# Altium PCB Self_Balancing.PcbDoc
Units mm, origin at the board's own origin, x right, y up, seen from the top; angles counter-clockwise.
Board outline 70 x 100 mm, 2 copper layers (Top Layer, Bottom Layer); 26 components, 27 nets, 155 pads, 79 vias.
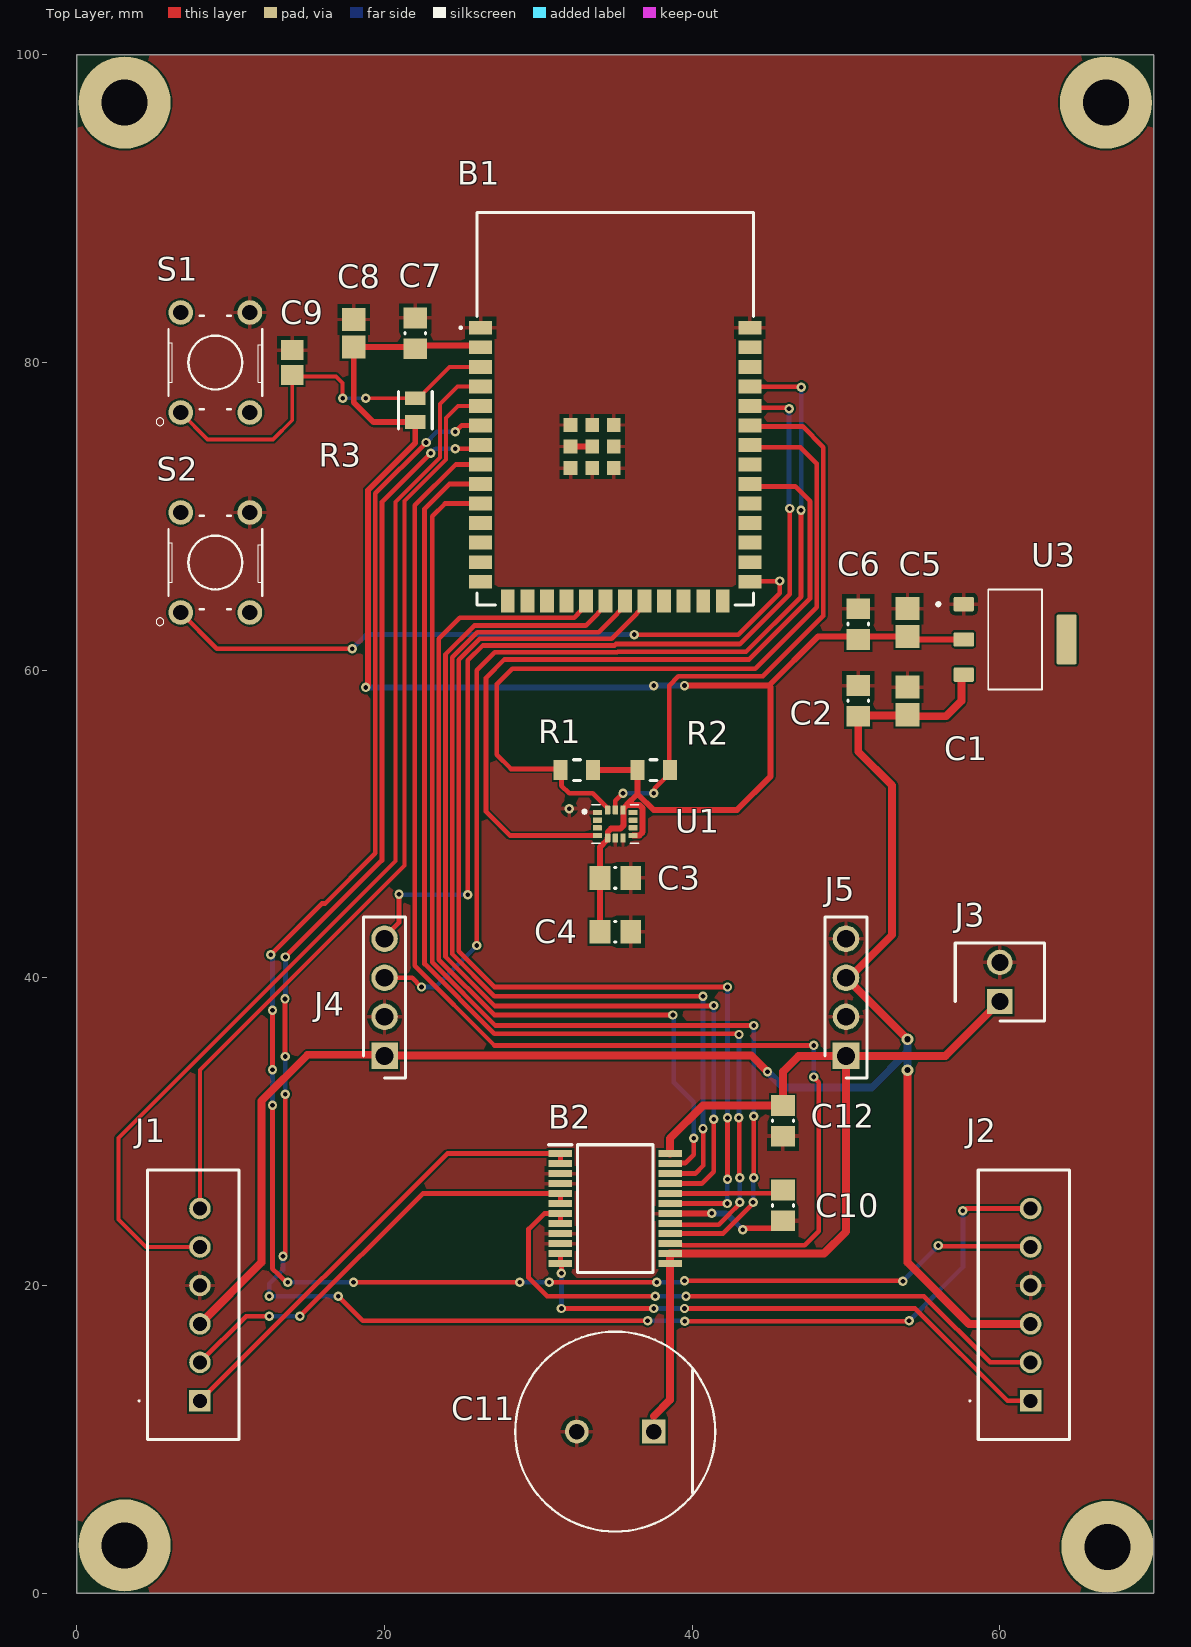
[diagram p0: Top Layer view]
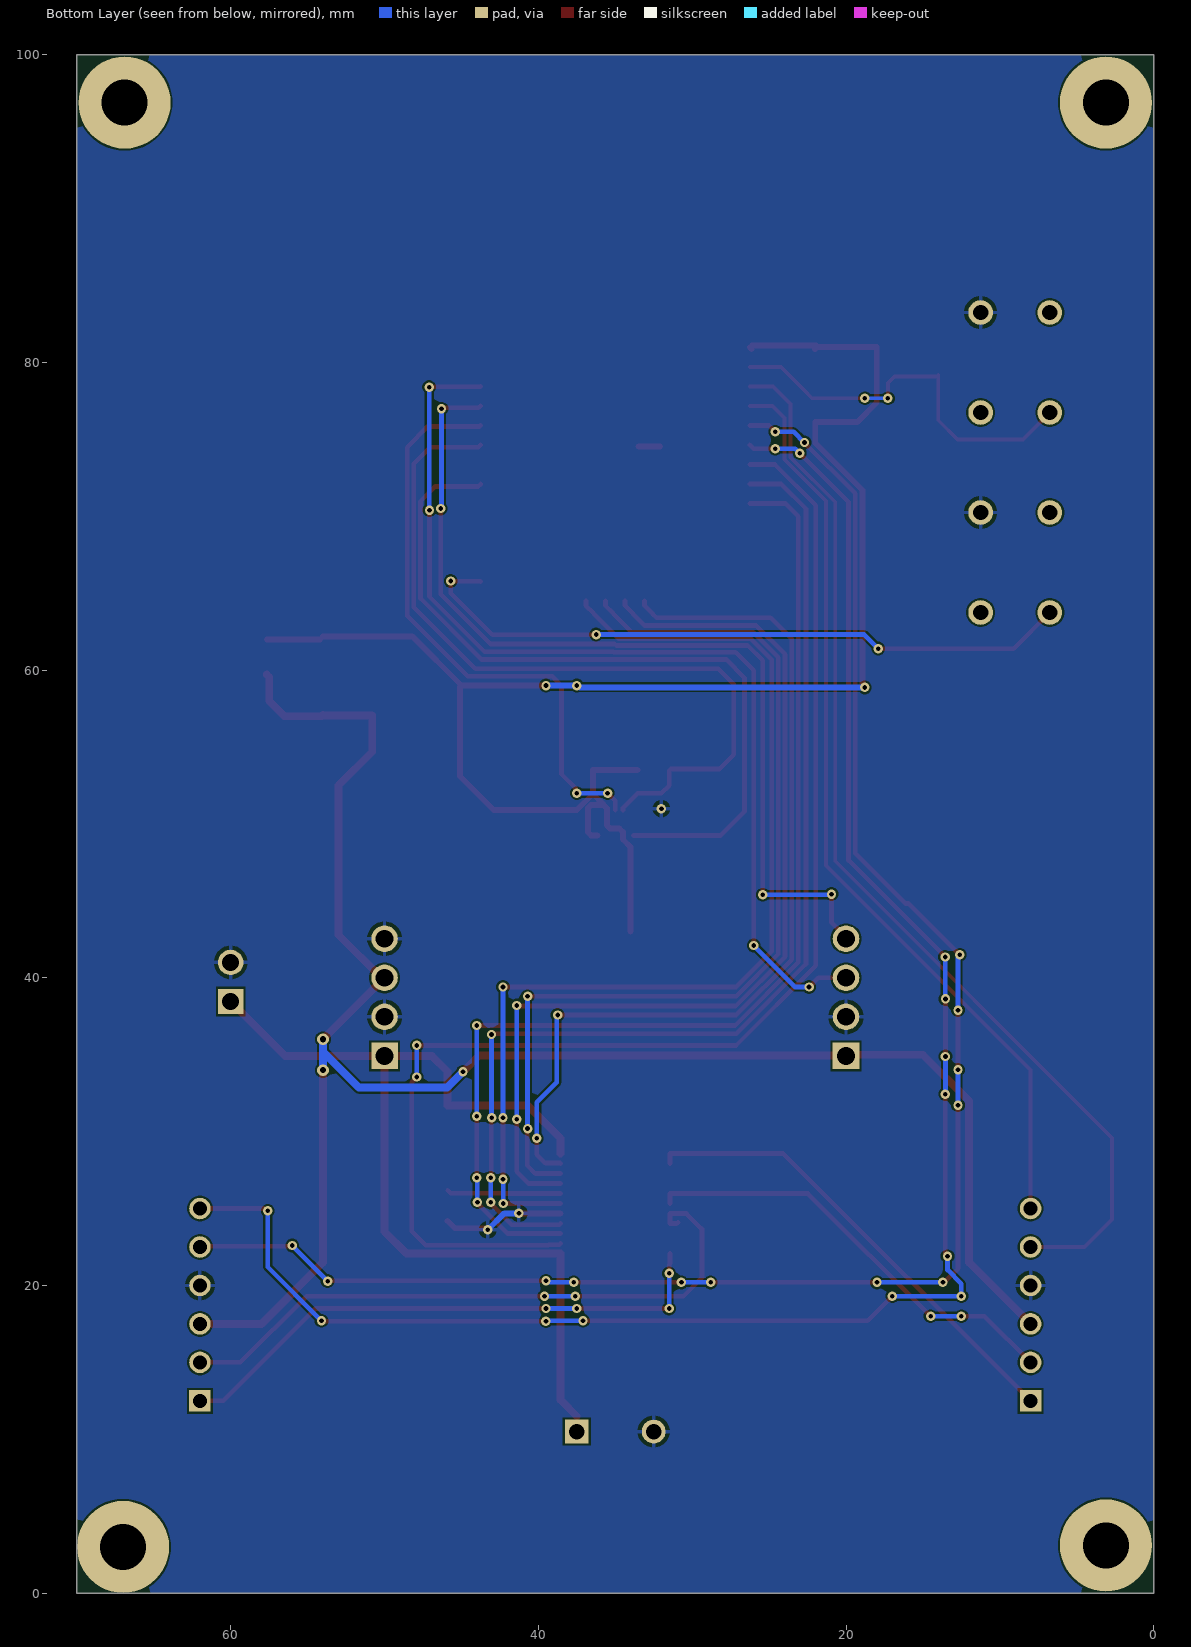
[diagram p1: Bottom Layer view, seen from below]

## Layer stack, top to bottom
Top Solder: solder mask 0.0102, Solder Resist, Dk 3.5
Top Layer: signal copper 0.0356
Dielectric 1: dielectric 0.32, FR-4, Dk 4.8
Bottom Layer: signal copper 0.0356
Bottom Solder: solder mask 0.0102, Solder Resist, Dk 3.5

## Board outline
0,0 0,100 70,100 70,0

## Design rules (kind name [scope] priority, off if disabled: settings)
Clearance [All] p1: gap=0.127 ignorepadtopadclearanceinfootprint=FALSE
HoleSize [All] p1: absolutevalues=TRUE maxlimit=5 minlimit=0.025 maxpercent=80.000 minpercent=20.000
MinimumSolderMaskSliver [All] p1: minsoldermaskwidth=0.08
PolygonConnect [All] p1: connectstyle=Relief reliefconductorwidth=0.254 reliefentries=4 polygonreliefangle="90 Angle" airgapwidth=0.254
RoutingVias [All] p1: holewidth=0.508 width=1.016 viastyle="Through Hole" minholewidth=0.305 minwidth=0.61 maxholewidth=1.27 maxwidth=2.54
SilkToSolderMaskClearance [IsPad] p1: minsilkscreentomaskgap=0.01 clearancetoexposedcopper=TRUE
SolderMaskExpansion [All] p1: expansion=0 istentingtop=FALSE
SupplyNets "Schematic Supply Nets_3" [InNet('3.3V')] p1: voltage=0.000
SupplyNets "Schematic Supply Nets_2" [InNet('12V')] p2: voltage=0.000
SupplyNets "Schematic Supply Nets_1" [InNet('5V')] p3: voltage=0.000
SupplyNets "Schematic Supply Nets" [InNet('GND')] p4: voltage=0.000
Width Width_Power [InNet('12V') OR InNet('5V') OR InNet('3.3V') OR InNet('GND')] p1: maxlimit=0.508 minlimit=0.381 preferedwidth=0.457
Width Width_Signal [All] p2: maxlimit=0.381 minlimit=0.2 preferedwidth=0.305
27 further rules are at their usual default settings.

## Components (designator, comment, footprint, x,y, rotation, side; value= is the part's Value field where it differs from the comment)
B1 "ESP32-S3-WROOM-1" ESP32S3WROOM1 35,77 r0 top locked
B2 "TB6612FNG" SOP65P760X160-24N 35,25 r0 top locked
C1 "10uF" CAPC2013X140X50ML20T25 54,58 r90 top
C2 "0.1uF" CAPC0805(2012)100_M 50.8,58 r270 top value=100nF
C3 "0.1uF" CAPC0805(2012)100_M 35,46.5 r0 top value=100nF
C4 "0.1uF" CAPC0805(2012)100_M 35,43 r0 top value=100nF
C5 "10uF" CAPC2013X140X50ML20T25 54,63.1 r90 top
C6 "0.1uF" CAPC0805(2012)100_M 50.8,63 r90 top value=100nF
C7 "0.1uF" CAPC0805(2012)100_M 22,81.9 r270 top value=100nF
C8 "10uF" CAPC2013X140X50ML20T25 18,81.9 r90 top
C9 "1uF" CAPC2013X140X50NL20T25 14,80 r270 top
C10 "0.1uF" CAPC0805(2012)100_M 45.9,25.2 r270 top value=100nF
C11 "470uF" FP-RAD-TH-D_12_5_0_5-L_30-MFG 35,10.5 r180 top
C12 "0.1uF" CAPC0805(2012)100_M 45.9,30.7 r90 top value=100nF
J1 "MOTOR_L" WAFERXH2546PZZ 8,12.5 r90 top
J2 "MOTOR_R" WAFERXH2546PZZ 62,12.5 r90 top
J3 "HDR2" SHDR2W64P0X254_1X2_508X580X1170P 60,38.46 r270 top
J4 "UART" HDRV4W95P0X254_1X4_1016X254X854P 20,34.92 r90 top
J5 "MOD_LM2596" HDRV4W95P0X254_1X4_1016X254X854P 50,34.92 r90 top
R1 "4.7kR" FP-RMCF0805-MFG 32.5,53.5 r0 top
R2 "4.7kR" FP-RMCF0805-MFG 37.5,53.5 r180 top
R3 "10kR" FP-CRGP0805-IPC_C 22,76.9 r90 top value=10KΩ
S1 "B3F-1000" SW_B3F-1000 9,80 r90 top
S2 "B3F-1000" SW_B3F-1000 9,67 r90 top
U1 "BMI160" PQFN50P250X300X88-14N 35,50 r0 top locked
U3 "AMS1117-3.3" SOT229P700X180-4N 61,62 r0 top

## Footprints (in the part's own frame and the unit in brackets; to place one, negate y for a bottom-side part, rotate by r counter-clockwise, add the part's x,y. Pads: shape width x height; smd on the part's side, far side on the other; paste and mask are expansions set on the pad)
CAPC0805(2012)100_M [mm] "Chip Capacitor, Body 2.0x1.2mm, Height 1.0mm, IPC Low Density"
  rect 1.35x1.55 smd: 1(-1,0) 2(1,0)
  silkscreen extent -0.05,-0.67 0.05,0.67, body extent -1.1,-0.72 1.1,0.72, height 1
CAPC2013X140X50ML20T25 [mm] "Chip Capacitor, 2-Leads, Body 2.00x1.25mm, IPC Low Density"
  rect 1.5x1.55 smd: 1(-0.9,0) 2(0.9,0)
  body extent -1.1,-0.72 1.1,0.72, height 1.4
CAPC2013X140X50NL20T25 [mm] "Chip Capacitor, 2-Leads, Body 2.00x1.25mm, IPC Medium Density"
  rect 1.3x1.45 smd: 1(-0.8,0) 2(0.8,0)
  body extent -1.1,-0.72 1.1,0.72, height 1.4
ESP32S3WROOM1 [mm]
  rect 1.5x0.9 smd: 1(-8.75,5.26) 2(-8.75,3.99) 3(-8.75,2.72) 4(-8.75,1.45) 5(-8.75,0.18) 6(-8.75,-1.09) 7(-8.75,-2.36) 8(-8.75,-3.63) 9(-8.75,-4.9) 10(-8.75,-6.17) 11(-8.75,-7.44) 12(-8.75,-8.71) 13(-8.75,-9.98) 14(-8.75,-11.25) 27(8.75,-11.25) 28(8.75,-9.98) 29(8.75,-8.71) 30(8.75,-7.44) 31(8.75,-6.17) 32(8.75,-4.9) 33(8.75,-3.63) 34(8.75,-2.36) 35(8.75,-1.09) 36(8.75,0.18) 37(8.75,1.45) 38(8.75,2.72) 39(8.75,3.99) 40(8.75,5.26)
  rect 0.9x1.5 smd: 15(-6.985,-12.5) 16(-5.715,-12.5) 17(-4.445,-12.5) 18(-3.175,-12.5) 19(-1.905,-12.5) 20(-0.635,-12.5) 21(0.635,-12.5) 22(1.905,-12.5) 23(3.175,-12.5) 24(4.445,-12.5) 25(5.715,-12.5) 26(6.985,-12.5)
  rect 0.9x0.9 smd: 41(-1.5,-2.46) 42(-1.5,-1.06) 43(-2.9,-1.06) 44(-2.9,-2.46) 45(-2.9,-3.86) 46(-1.5,-3.86) 47(-0.1,-3.86) 48(-0.1,-2.46) 49(-0.1,-1.06)
  silkscreen extent -10.1,-12.75 9,12.75
FP-CRGP0805-IPC_C [mm]
  rect 0.906x1.31 smd paste+0 mask+0: 1(-0.776,0) 2(0.776,0)
  silkscreen extent -1.23,-1.1 1.23,1.1, body extent -1.33,-0.8 1.33,0.8, height 0.25
FP-RAD-TH-D_12_5_0_5-L_30-MFG [mm]
  rect 1.55x1.55 hole 1 paste-2539.97 mask+0: 1(-2.5,0)
  round 1.55 hole 1 paste-2539.97 mask+0: 2(2.5,0)
  silkscreen extent -6.5,-6.5 6.5,6.5, body extent -6.6,-6.6 6.6,6.6, height 0.25
FP-RMCF0805-MFG [mm]
  rect 0.9x1.3 smd paste+0 mask+0: 1(-1.05,0) 2(1.05,0)
  silkscreen extent -0.23,-0.67 0.23,0.67, body extent -1.6,-0.77 1.6,0.77, height 0.25
HDRV4W95P0X254_1X4_1016X254X854P [mm]
  rect 1.725x1.725 / inner round 1.725 / far side rect 1.725x1.725 hole 1.15: 1(0,0)
  round 1.725 hole 1.15: 2(2.54,0) 3(5.08,0) 4(7.62,0)
  silkscreen extent -1.42,-1.37 9.04,1.37
PQFN50P250X300X88-14N [mm]
  rrect25% 0.59x0.35 smd: 1(-1.165,0.75) 2(-1.165,0.25) 3(-1.165,-0.25) 4(-1.165,-0.75) 8(1.165,-0.75) 9(1.165,-0.25) 10(1.165,0.25) 11(1.165,0.75)
  rrect25% 0.35x0.59 smd: 5(-0.5,-0.915) 6(0,-0.915) 7(0.5,-0.915) 12(0.5,0.915) 13(0,0.915) 14(-0.5,0.915)
  silkscreen extent -2.1,-1.25 1.5,1.25
SHDR2W64P0X254_1X2_508X580X1170P [mm]
  rect 1.65x1.65 / inner round 1.65 / far side rect 1.65x1.65 hole 1.1: 1(0,0)
  round 1.65 hole 1.1: 2(-2.54,0)
  silkscreen extent -3.81,-2.9 1.27,2.9
SOP65P760X160-24N [mm]
  rect 1.525x0.45 smd: 1(-3.562,3.575) 2(-3.562,2.925) 3(-3.562,2.275) 4(-3.562,1.625) 5(-3.562,0.975) 6(-3.562,0.325) 7(-3.562,-0.325) 8(-3.562,-0.975) 9(-3.562,-1.625) 10(-3.562,-2.275) 11(-3.562,-2.925) 12(-3.562,-3.575) 13(3.562,-3.575) 14(3.562,-2.925) 15(3.562,-2.275) 16(3.562,-1.625) 17(3.562,-0.975) 18(3.562,-0.325) 19(3.562,0.325) 20(3.562,0.975) 21(3.562,1.625) 22(3.562,2.275) 23(3.562,2.925) 24(3.562,3.575)
  silkscreen extent -4.33,-4.15 2.45,4.15
SOT229P700X180-4N [mm]
  rrect15% 1.31x0.93 smd: 1(-3.345,2.29) 2(-3.345,0) 3(-3.345,-2.29)
  rrect15% 1.31x3.24 smd: 4(3.345,0)
  silkscreen extent -5.1,-3.25 1.75,3.25, body extent -3.25,-3.5 3.25,3.5, height 1.8
SW_B3F-1000 [mm]
  round 1.6 hole 1: 1(-3.25,2.25) 2(3.25,2.25) 3(-3.25,-2.25) 4(3.25,-2.25)
  silkscreen extent -4.1,-3.05 3.05,3.85, body extent -3.85,-3 3.85,3, height 4.3
WAFERXH2546PZZ [mm]
  rect 1.4x1.4 hole 0.9: 1(0,0)
  round 1.4 hole 0.9: 2(2.5,0) 3(5,0) 4(7.5,0) 5(10,0) 6(12.5,0)
  silkscreen extent -2.5,-2.54 15,4

## Part data
B1: "WiFi Modules - 802.11 (Engineering Samples Only) SMD Module, ESP32-S3, 8 MB SPI Flash, PCB Antenna", Manufacturer_Name="Espressif Systems", Datasheet Link=https://www.mouser.com/catalog/specsheets/Espressif_ESP32_S3_WROOM_1_1U_Preliminary.pdf, Geometry.Height=3.25mm, Manufacturer_Part_Number=ESP32-S3-WROOM-1
B2: "Brush motor driver IC", Manufacturer_Name=Toshiba, Mouser Part Number=N/A, Datasheet Link=https://datasheet.datasheetarchive.com/originals/distributors/SFDatasheet-6/sf-000138015.pdf, Geometry.Height=1.6mm, Manufacturer_Part_Number=TB6612FNG, Mouser Price/Stock=https://www.mouser.co.uk/ProductDetail/Toshiba/TB6612FNG?qs=By6Nw2ByBD2hYPrK9yTkWQ%3D%3D
C1 C5 C8: library part CMP-2007-03244-1, Manufacturer=Kemet, Part Number=C0805C106K9RACTU
C2 C3 C4 C6 C7 C10 C12: library part CMP-1036-04393-1, "CAP 100nF 10V ±5% 0805 (2012 Metric) Thickness 1mm SMD", Case-EIA=0805, Case-Metric=2012, Rated Voltage="10 V", Tolerance=Â±5%, Max Thickness="1 mm", Technology=SMT
C9: library part CMP-2007-04663-1, Manufacturer="AVX Interconnect / Elco", Part Number=0805YD105MAT2A
C11: library part CMP-05427-000129-1, "Aluminum Electrolytic Capacitors (Radial Lead Type) 470uF ±20% 80V", RoHS Compliant=Yes
J1 J2: library part WAFER-XH2.54-6PZZ, "1x6P 1 6P 2.54mm 6 -25~+85 2A Straight Plugin,P=2.54mm Wire To Board Connector ROHS", Manufacturer_Name=XUNPU, Datasheet Link=https://wmsc.lcsc.com/wmsc/upload/file/pdf/v2/lcsc/2302211801_XUNPU-WAFER-XH2-54-6PZZ_C5359634.pdf, Geometry.Height=7.25mm, Manufacturer_Part_Number=WAFER-XH2.54-6PZZ
J3: library part 0022272021, "KK 254 Wire-to-Board Header, Vertical, with Friction Lock, 2 Circuits, Tin (Sn) Plating", Manufacturer_Name=Molex, Mouser Part Number=N/A, Arrow Part Number=0022272021, Arrow Price/Stock=https://www.arrow.com/en/products/0022272021/molex?utm_currency=USD&region=nac, Datasheet Link=https://www.molex.com/en-us/products/part-detail-pdf/22272021?display=pdf, Geometry.Height=11.7mm, Manufacturer_Part_Number=0022272021, Mouser Price/Stock=https://www.mouser.co.uk/ProductDetail/Molex/0022272021?qs=PBcRNPEHKsoTuJ7eDXMaUA%3D%3D
J4 J5: library part 61300411121, "WR-PHD 2.54 mm Pin Header 4 pins, 1 row, straight, gold plating", Manufacturer_Name="Wurth Elektronik", Mouser Part Number=710-61300411121, Datasheet Link=https://www.we-online.com/components/products/datasheet/61300411121.pdf, Geometry.Height=8.54mm, Manufacturer_Part_Number=61300411121, Mouser Price/Stock=https://www.mouser.co.uk/ProductDetail/Wurth-Elektronik/61300411121?qs=PhR8RmCirEYQcLLqXD8rAA%3D%3D
R1 R2: library part CMP-26527-004085-1, "4.7kΩ ±5% 0.125W 0805 Thick Film Chip Resistor AEC-Q200 compliant", Case Code (Imperial)=0805, Case Code (Metric)=2012, Max Operating Temperature=155°C, Max Power Dissipation=125mW, Min Operating Temperature=-55°C, Package Quantity=10000, Resistor Type="Thick Film", Temperature Coefficient=200ppm/°C, Tolerance=5%, Case/Package=0805, Contact Plating=Tin, Features="Automotive AEC-Q200", Height=0.026inch, Length=0.079inch, Mount="Surface Mount", Number of Terminations=2, Packaging="Tape and Reel", Radiation Hardening=No, Resistance=4.7kR, RoHS Compliant=Yes, Series=RMCF, Width=0.049inch
R3: library part CMP-03211-006861-1, "CRGP 0805 10K 1%", Ambient Temperature Range High=+70°C, Manufacturer=TE, Manufacturer Part Number=CRGP0805F10K, Package=CRGP0805, Power Rating=0.33W, Resistance=10KΩ, Temperature="-55°C to +155°C", Temperature Coefficient=±100ppm/°C, Temperature Range High=+155°C, Temperature Range Low=-55°C, Tolerance=0.01, Voltage Rating=150V, Automotive=No, Category=Res, ComponentLink2Description=Datasheet, ComponentLink2URL=https://www.mouser.com/datasheet/2/418/NG_DS_9-1773463-9_A-1358566.pdf, Composition="Thick Film", Device Class L1="Passive Components", Device Class L2=Resistors, Device Class L3="Chip SMD Resistors", Digikey Description="CRGP 0805 10K 1%", Height=0.65mm, Ipc Land Pattern Name=RESC200125X55, Lead Free=Yes, Octopart=https://octopart.com/crgp0805f10k-te+connectivity-91018782, RoHS=TRUE, Series=CRGP
S1 S2: "Tactile Switch SPST-NO Top Actuated Through Hole", Package=None, Availability="In Stock", Check_prices=https://www.snapeda.com/parts/B3F-1000/Omron+Electronics+Inc-EMC+Div/view-part/?ref=eda, MF=Omron, MP=B3F-1000, Price=None, Purchase-URL=https://pricing.snapeda.com/search/part/B3F-1000/?ref=eda, SnapEDA_Link=https://www.snapeda.com/parts/B3F-1000/Omron+Electronics+Inc-EMC+Div/view-part/?ref=snap
U1: "Accelerometer, Gyroscope, 6 Axis Sensor IÂ²C, SPI Output", Package=None, Availability=Unavailable, ComponentLink1Description="New link", MP=BMI160, Price=None
U3: "Sot223/Pkg 1-Amp 3.3-Volt Low Drop Out Voltage Regulatator", Package="SOT-223 Seeed Technology", Check_prices=https://www.snapeda.com/parts/AMS1117-3.3/Advanced+Monolithic+Systems/view-part/?ref=eda, MF="Advanced Monolithic Systems", MP=AMS1117-3.3, SnapEDA_Link=https://www.snapeda.com/parts/AMS1117-3.3/Advanced+Monolithic+Systems/view-part/?ref=snap

## Free pads (board coordinates)
  round 6 hole 3: 2(67,3) 3(3.1,3.1) 4(3.1,96.9) 5(66.9,96.9)

## Via types
v1: diameter 0.61, hole 0.305, Top Layer to Bottom Layer, 77 vias
v2: diameter 0.762, hole 0.406, Top Layer to Bottom Layer, 2 vias

## Nets (pads, with @x,y where several pads share a name; then routed paths per layer and width w, separated by ;. In a path a pad name is that pad's centre, name@x,y a point inside that pad or via, vN(x,y) a via of type N, cw(c..) or ccw(c..) an arc to the next point about the centre after c; other vN are vias at no path point)
3.3V: B1.2 C3.1 C4.1 C5.1 C6.1 C7.2 C8.1 R1.2 R2.2 R3.1 U1.5 U1.8 U1.12 U3.2 | length 109.4
  Top Layer w0.381: v1@18.8,58.9 18.93,59.03 18.93,71.695 22,74.765 R3.1 19.276,76.124 18,77.4 C8.1 21.9,81 C7.2@22.01,80.89 ; C7.2@21.96,81.1 B1.2@26.1,81.1 ; B1.2@26.15,80.89 B1.2 ; R1.2 R2.2 36.45,51.954 ; C4.1 C3.1 34,48.496 34.5,48.996 U1.5 34.508,49.092 34.508,49.486 34.722,49.7 35.329,49.7 35.547,49.917 35.547,51.025 35.764,51.242 36.566,51.242 36.778,51.031 36.778,49.469 36.566,49.257 36.173,49.257 U1.8 ; 35.751,51.255 36.45,51.954 ; v1(39.5,59) 45,59 ; U3.2 54.2,62 C5.1 48.2,62.2 45,59 ; 36.45,51.954 37.5,50.904 42.904,50.904 45.1,53.1 45.1,58.9 45,59
  Bottom Layer w0.381: v1(18.778,58.879) 37.317,58.879 37.438,59 v1(37.5,59) v1(39.5,59)
5V: C1.1 C2.2 J1.3 J2.3 J4.1 J5.3 U3.3 | length 119.5
  Top Layer w0.508: J1.3 12,21.5 12,32 15,35 19.92,35 J4.1 19.96,34.96 43.84,34.96 v1(44.9,33.9) ; v2(54,34) 54,21.5 58,17.5 J2.3 ; v2(54,36) J5.3 50.202,40 53,42.798 53,52.5 50.8,54.7 50.8,57.05 53.95,57.05 C1.1 54.1,57 56.5,57 57.5,58 57.5,59.555 U3.3
  Bottom Layer w0.508: v1(44.9,33.9) 45.936,32.864 51.664,32.864 54,35.2 ; v2(54,34) 54,35.2 ; v2(54,36) 54,35.2
12V: B2.13 B2.14 B2.24 C11.1 C12.2 J3.1 J5.1 | length 61.9
  Top Layer w0.508: 37.5,11.5 38.562,12.562 B2.13 B2.14 48.575,22.075 50,23.5 J5.1 ; B2.24 38.562,29.562 40.7,31.7 C12.2 45.9,33.9 46.92,34.92 J5.1 ; J3.1 56.46,34.92 J5.1
GND: B1.1 B1.40 B1.41 B1.42 B1.43 B1.44 B1.45 B1.46 B1.47 B1.48 B1.49 B2.3 B2.4 B2.9 B2.10 B2.18 C1.2 C2.1 C3.2 C4.2 C5.2 C6.2 C7.1 C8.2 C9.1 C10.2 C11.2 C12.1 J1.4 J2.4 J3.2 J4.2 J5.2 J5.4 S1.4 S2.4 U1.1 U1.6 U1.7 U3.1 | length 9.5
  Top Layer w0.381: B1.44 B1.41 ; B2.18 41.275,24.675 v1@41.3,24.7 ; v1(43.287,23.613) 43.349,23.613 43.452,23.715 45.415,23.715 C10.2
  Bottom Layer w0.381: v1(41.263,24.687) 42.213,24.687 v1@43.3,23.6
  other v1: 32,51
NetB1_3: B1.3 C9.2 R3.2 S1.1 | length 25.8
  Top Layer w0.254: S1.1 8.5,75 12.75,75 14,76.25 C9.2 14.101,79.099 16.857,79.099 17.276,78.679 v1(17.276,77.676) ; v1(18.776,77.676) R3.2 22.202,77.676 22.528,78.002 22.528,78.029 24.219,79.72 B1.3
  Bottom Layer w0.254: v1(17.276,77.676) v1(18.776,77.676)
NetB1_4: B1.4 J1.5 | length 70.8
  Top Layer w0.254: J1.5 4.5,22.5 2.7,24.3 2.7,29.6 20.7,47.6 20.7,70.939 23.6,73.839 23.6,77.3 24.75,78.45 B1.4
NetB1_5: B1.5 J1.6 | length 60.6
  Top Layer w0.254: J1.6 8,34 21.3,47.3 21.3,71 24,73.7 24,76.4 24.78,77.18 B1.5
NetB1_6: B1.6 J2.5 | length 112.9
  Top Layer w0.305: v1(12.6,41.5) 15.929,44.829 16.129,44.829 19.4,48.1 19.4,71.5 v1(22.7,74.8) ; v1(12.715,31.715) 12.715,21.085 13.11,20.69 13.128,20.69 13.617,20.2 v1(13.7,20.2) ; v1(12.715,34.015) v1(12.715,37.896) ; v1(17.983,20.2) v1(28.8,20.2) ; v1(24.6,75.5) 25.01,75.91 B1.6 ; v1(30.7,20.2) v1(37.7,20.2) ; v1(39.5,20.3) v1@53.7,20.3 ; v1(56,22.6) 56.05,22.55 61.95,22.55 J2.5
  Bottom Layer w0.305: v1(12.6,41.5) 12.6,41.417 12.715,41.302 v1(12.715,37.896) ; v1@12.7,31.7 v1(12.715,31.715) v1(12.715,34.015) ; v1(13.7,20.2) v1@18.046,20.2 ; v1(22.7,74.8) 23.4,75.5 v1(24.6,75.5) ; v1(28.8,20.2) v1(30.7,20.2) ; v1(37.7,20.2) 39.4,20.2 v1(39.5,20.3) ; v1(53.7,20.282) 56,22.582 v1(56,22.6)
NetB1_7: B1.7 J2.6 | length 118.1
  Top Layer w0.305: v1(13.4,21.9) 13.552,22.052 v1(13.552,32.434) ; v1@13.5,34.9 13.528,34.928 v1(13.528,38.628) ; v1(13.556,41.356) 19.832,47.632 19.832,70.932 v1(23,74.1) ; v1(16.985,19.301) 18.586,17.7 v1(37.1,17.7) ; v1(24.6,74.4) 26.01,74.4 B1.7 ; v1(39.509,17.678) 54.078,17.678 v1(54.1,17.7) ; v1(57.588,24.856) 57.67,24.856 57.815,25 J2.6
  Bottom Layer w0.305: v1(13.4,21.9) 13.4,21.009 12.5,20.109 v1(12.5,19.3) v1@17,19.3 ; v1@13.5,38.6 13.556,38.656 v1(13.556,41.356) ; v1(13.536,34.884) 13.536,32.464 v1@13.6,32.4 ; v1(23,74.1) 23.3,74.4 v1(24.6,74.4) ; v1(37.1,17.7) v1@39.5,17.7 ; v1(54.1,17.7) 57.6,21.2 v1@57.6,24.9
NetB1_8: B1.8 B2.15 | length 85.7
  Top Layer w0.305: B1.8 24.62,73.37 21.968,70.718 21.968,40.782 27.15,35.6 47.894,35.6 v1(47.9,35.606) ; B2.15 38.634,22.653 39.307,22.653 39.351,22.609 47.309,22.609 48.232,23.532 48.232,33.218 v1(47.9,33.55)
  Bottom Layer w0.305: v1(47.9,33.55) v1(47.9,35.606)
NetB1_9: B1.9 B2.17 | length 72.4
  Top Layer w0.305: B1.9 24.2,72.1 22.6,70.5 22.6,40.9 27.139,36.361 43.002,36.361 v1(43.047,36.316) ; B2.17 38.634,23.953 39.376,23.953 41.737,23.952 42.389,24.605 42.389,24.612 43.1,25.323 v1(43.1,25.4) ; v1(43.037,30.9) 43.068,30.868 43.068,27.032 v1(43.1,27)
  Bottom Layer w0.305: v1(43.037,30.9) 43.042,30.905 43.042,36.31 v1(43.047,36.316) ; v1(43.1,25.4) v1(43.1,27)
NetB1_10: B1.10 B2.16 | length 72.9
  Top Layer w0.305: B1.10 23.93,70.83 23.1,70 23.1,41.011 27.211,36.9 v1(44,36.9) ; B2.16 42.002,23.375 43.96,25.333 v1(43.96,25.415) ; v1(44,27) v1(44,31)
  Bottom Layer w0.305: v1(43.96,25.415) 43.98,25.435 43.98,26.98 v1(44,27) ; v1(44,31) v1(44,36.9)
NetB1_19: B1.19 B2.23 | length 59.7
  Top Layer w0.305: B1.19 33.095,64.2 32.582,63.687 32.582,63.662 32.32,63.4 24.9,63.4 23.532,62.032 23.532,41.19 27.137,37.584 v1(38.747,37.584) ; B2.23 38.593,27.956 39.556,27.956 40.1,28.5 v1(40.1,29.569)
  Bottom Layer w0.305: v1(38.747,37.584) 38.8,37.532 38.8,33.2 40.1,31.9 v1(40.1,29.569)
NetB1_20: B1.20 B2.21 | length 64.4
  Top Layer w0.305: B1.20 34.365,64.2 33.852,63.687 33.852,63.662 33.09,62.9 25.842,62.9 23.964,61.022 23.964,41.369 27.164,38.169 41.369,38.169 v1(41.4,38.2) ; B2.21 40.625,26.625 41.4,27.4 v1(41.4,30.8)
  Bottom Layer w0.305: v1(41.4,30.8) v1(41.4,38.2)
NetB1_21: B1.21 B2.22 | length 63.1
  Top Layer w0.305: B1.21 35.635,64.2 35.122,63.687 35.122,63.662 33.928,62.468 26.021,62.468 24.396,60.843 24.396,41.548 27.144,38.8 v1(40.7,38.8) ; B2.22 40.193,27.275 40.718,27.8 40.718,30.182 v1(40.7,30.2)
  Bottom Layer w0.305: v1(40.7,30.2) v1(40.7,38.8)
NetB1_22: B1.22 B2.19 | length 68.9
  Top Layer w0.305: B1.22 36.905,64.2 36.392,63.687 36.392,63.662 34.766,62.036 26.2,62.036 24.828,60.664 24.828,41.727 27.155,39.4 v1@42.133,39.4 ; B2.19 v1(42.275,25.325) v1@42.3,25.3 ; v1(42.3,26.9) v1(42.3,30.9)
  Bottom Layer w0.305: v1(42.275,25.325) 42.275,26.875 v1(42.3,26.9) ; v1(42.3,30.9) v1(42.3,39.4)
NetB1_27: B1.27 S2.1 | length 44.2
  Top Layer w0.305: S2.1 9.1,61.4 v1(17.9,61.4) ; v1@36.2,62.3 43,62.3 45.7,65 v1(45.7,65.8) 45.675,65.775 43.775,65.775 B1.27
  Bottom Layer w0.305: v1(17.9,61.4) 18.813,62.313 v1(36.243,62.313)
NetB1_32: B1.32 U1.4 | length 50.5
  Top Layer w0.305: U1.4 33.828,49.257 28.143,49.257 26.6,50.8 26.6,59.5 27.8,60.7 43.7,60.7 47.661,64.661 47.661,70.989 46.703,71.946 43.904,71.946 B1.32
NetB1_34: B1.34 R1.1 U1.14 | length 51
  Top Layer w0.305: U1.14 34.5,51.035 33.535,52 32,52 31.5,52.5 31.5,53.45 31.371,53.579 28.221,53.579 27.3,54.5 27.3,59.1 28.3,60.1 44.1,60.1 48.093,64.093 48.093,73.43 47.037,74.486 43.904,74.486 B1.34
NetB1_35: B1.35 R2.1 U1.13 | length 38.9
  Top Layer w0.305: U1.13 35,51.5 v1(35.5,52) ; v1(37.5,52) 37.568,52.068 37.568,52.318 38.5,53.25 38.5,59 39.1,59.6 44.6,59.6 48.525,63.525 48.525,74.498 47.177,75.846 43.814,75.846 B1.35
  Bottom Layer w0.305: v1(35.5,52) v1(37.5,52)
NetB1_36: B1.36 J4.4 | length 60.5
  Top Layer w0.305: J4.4 20,42.645 20.939,43.584 v1(20.939,45.441) ; v1(25.413,45.4) 25.413,60.638 26.379,61.604 34.945,61.604 35.041,61.7 43.1,61.7 46.348,64.948 v1(46.348,70.508) ; B1.36 43.872,77.058 46.242,77.058 v1(46.3,77)
  Bottom Layer w0.305: v1@20.9,45.4 v1(25.413,45.4) ; v1(46.3,77) 46.3,70.555 v1(46.348,70.508)
NetB1_37: B1.37 J4.3 | length 65.3
  Top Layer w0.305: J4.3 21.8,40 v1(22.4,39.4) ; v1(26,42.1) 25.997,42.103 25.997,59.997 27.172,61.172 35.124,61.172 35.152,61.2 43.5,61.2 47.077,64.777 v1(47.077,70.4) ; B1.37 43.775,78.425 47.075,78.425 v1(47.1,78.4)
  Bottom Layer w0.305: v1(22.4,39.4) 23.3,39.4 v1(26,42.1) ; v1(47.077,70.4) 47.088,70.412 47.088,78.388 v1(47.1,78.4)
NetB2_1: B2.1 B2.2 J1.1 | length 30.7
  Top Layer w0.305: J1.1 24.075,28.575 B2.1 B2.2
NetB2_5: B2.5 B2.6 J1.2 | length 28.6
  Top Layer w0.305: J1.2 11,18 v1(12.5,18) ; v1(14.5,18) 22.475,25.975 B2.5 B2.6
  Bottom Layer w0.305: v1(12.5,18) v1(14.5,18)
NetB2_7: B2.7 B2.8 J2.2 | length 41.8
  Top Layer w0.305: B2.8@30.922,24.098 30.994,24.025 B2.8 B2.7 30.375,24.675 29.365,23.665 29.365,20.5 30.565,19.3 v1(37.6,19.3) ; v1(39.6,19.3) 55.065,19.3 59.365,15 J2.2
  Bottom Layer w0.305: v1(37.6,19.3) v1(39.6,19.3)
NetB2_11: B2.11 B2.12 J2.1 | length 36.6
  Top Layer w0.305: B2.11 B2.12 31.5,21.363 v1(31.5,20.784) ; v1(31.5,18.5) v1(37.5,18.5) ; v1(39.5,18.5) 54.5,18.5 60.5,12.5 J2.1
  Bottom Layer w0.305: v1(31.5,18.5) v1(31.5,20.784) ; v1(37.5,18.5) v1(39.5,18.5)
NetB2_20: B2.20 C10.1 | length 7.4
  Top Layer w0.305: B2.20 42.354,25.975 42.379,26 45.7,26 C10.1
pads on no net: B1.11 B1.12 B1.13 B1.14 B1.15 B1.16 B1.17 B1.18 B1.23 B1.24 B1.25 B1.26 B1.28 B1.29 B1.30 B1.31 B1.33 B1.38 B1.39 S1.2 S1.3 S2.2 S2.3 U1.2 U1.3 U1.9 U1.10 U1.11 U3.4

## Polygon pours and split planes (outlines as drawn)
GND on Bottom Layer "GND_L02_P001" (solid, remove dead copper, pour order 1): 0,100 70,100 70,0 0,0
GND on Top Layer "GND_L01_P000" (solid, remove dead copper, pour order 0): 0,100 70,100 70,0 0,0

## Silkscreen, mask and mechanical layers (free items; w line width, h text height)
Mechanical 1:
  the board outline again, w0.2